# Altium PCB slots.PcbDoc
Units mil, origin at the board's own origin, x right, y up, seen from the top; angles counter-clockwise.
Board outline 2362.2 x 1574.8 mil, 2 copper layers (Top Layer, Bottom Layer); 2 components, 1 nets, 6 pads, 0 vias.
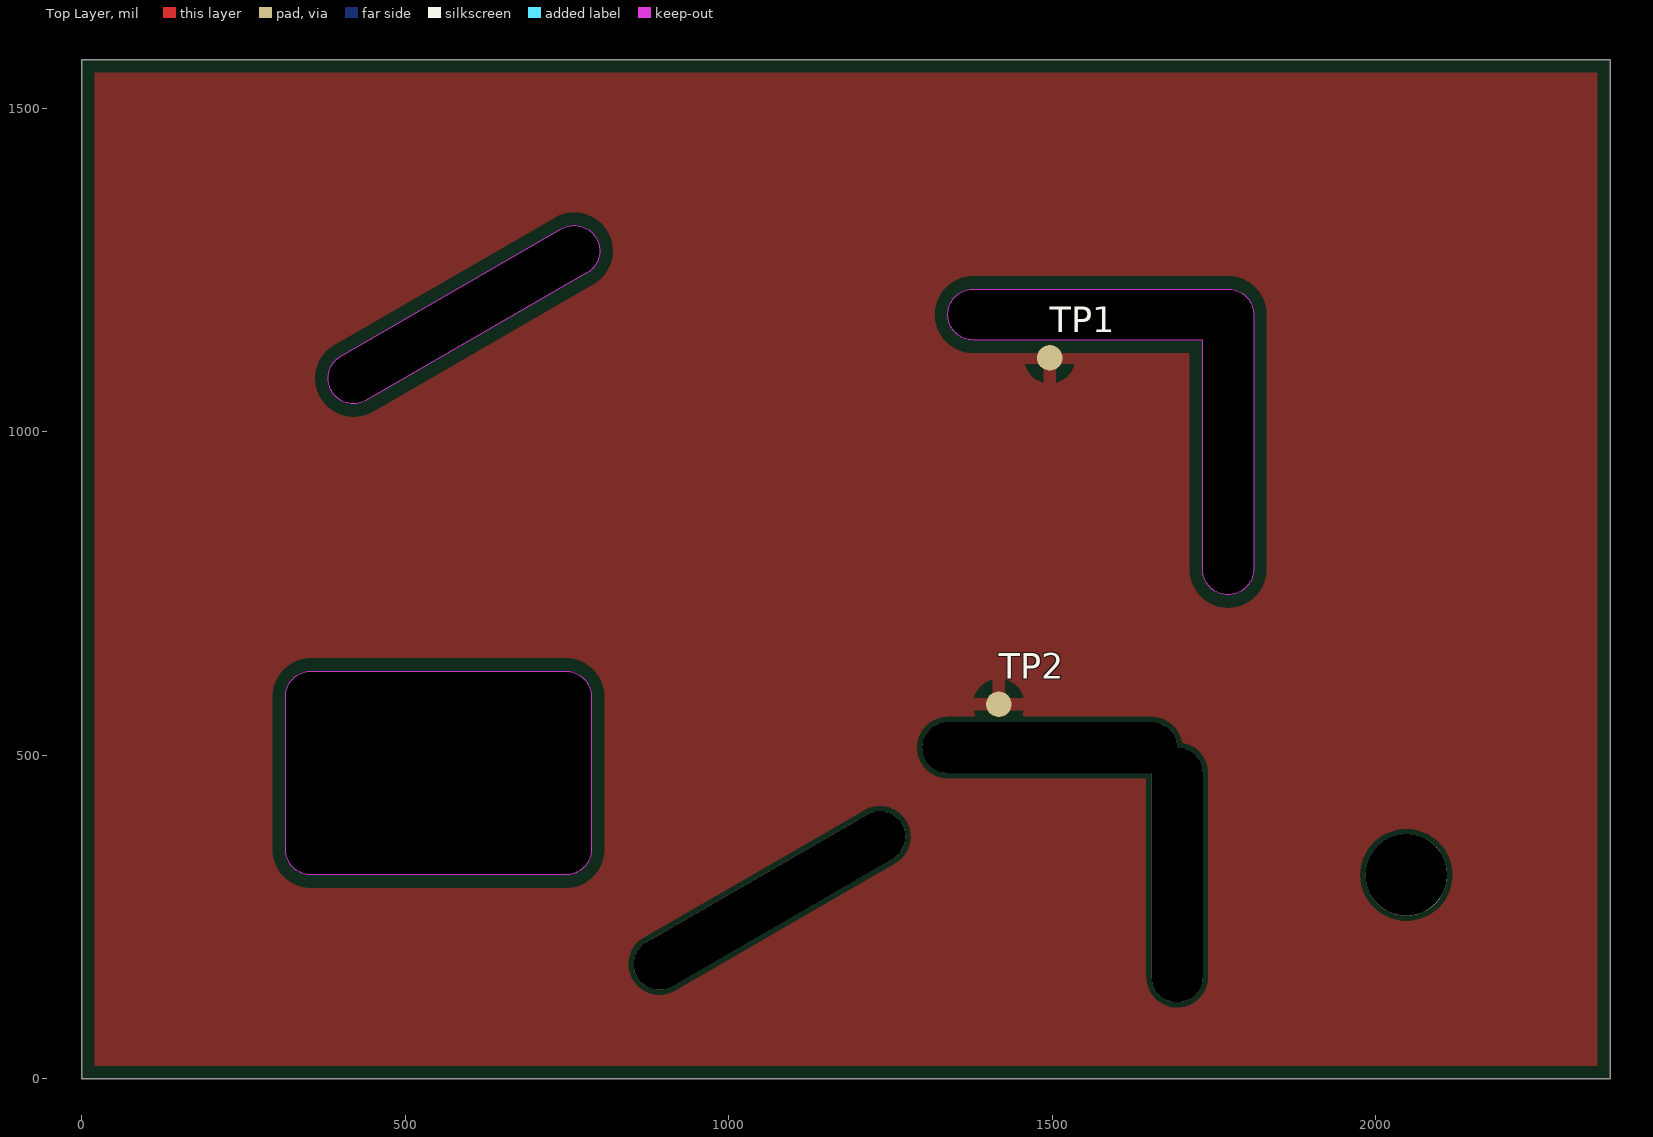
[diagram p0: Top Layer view]
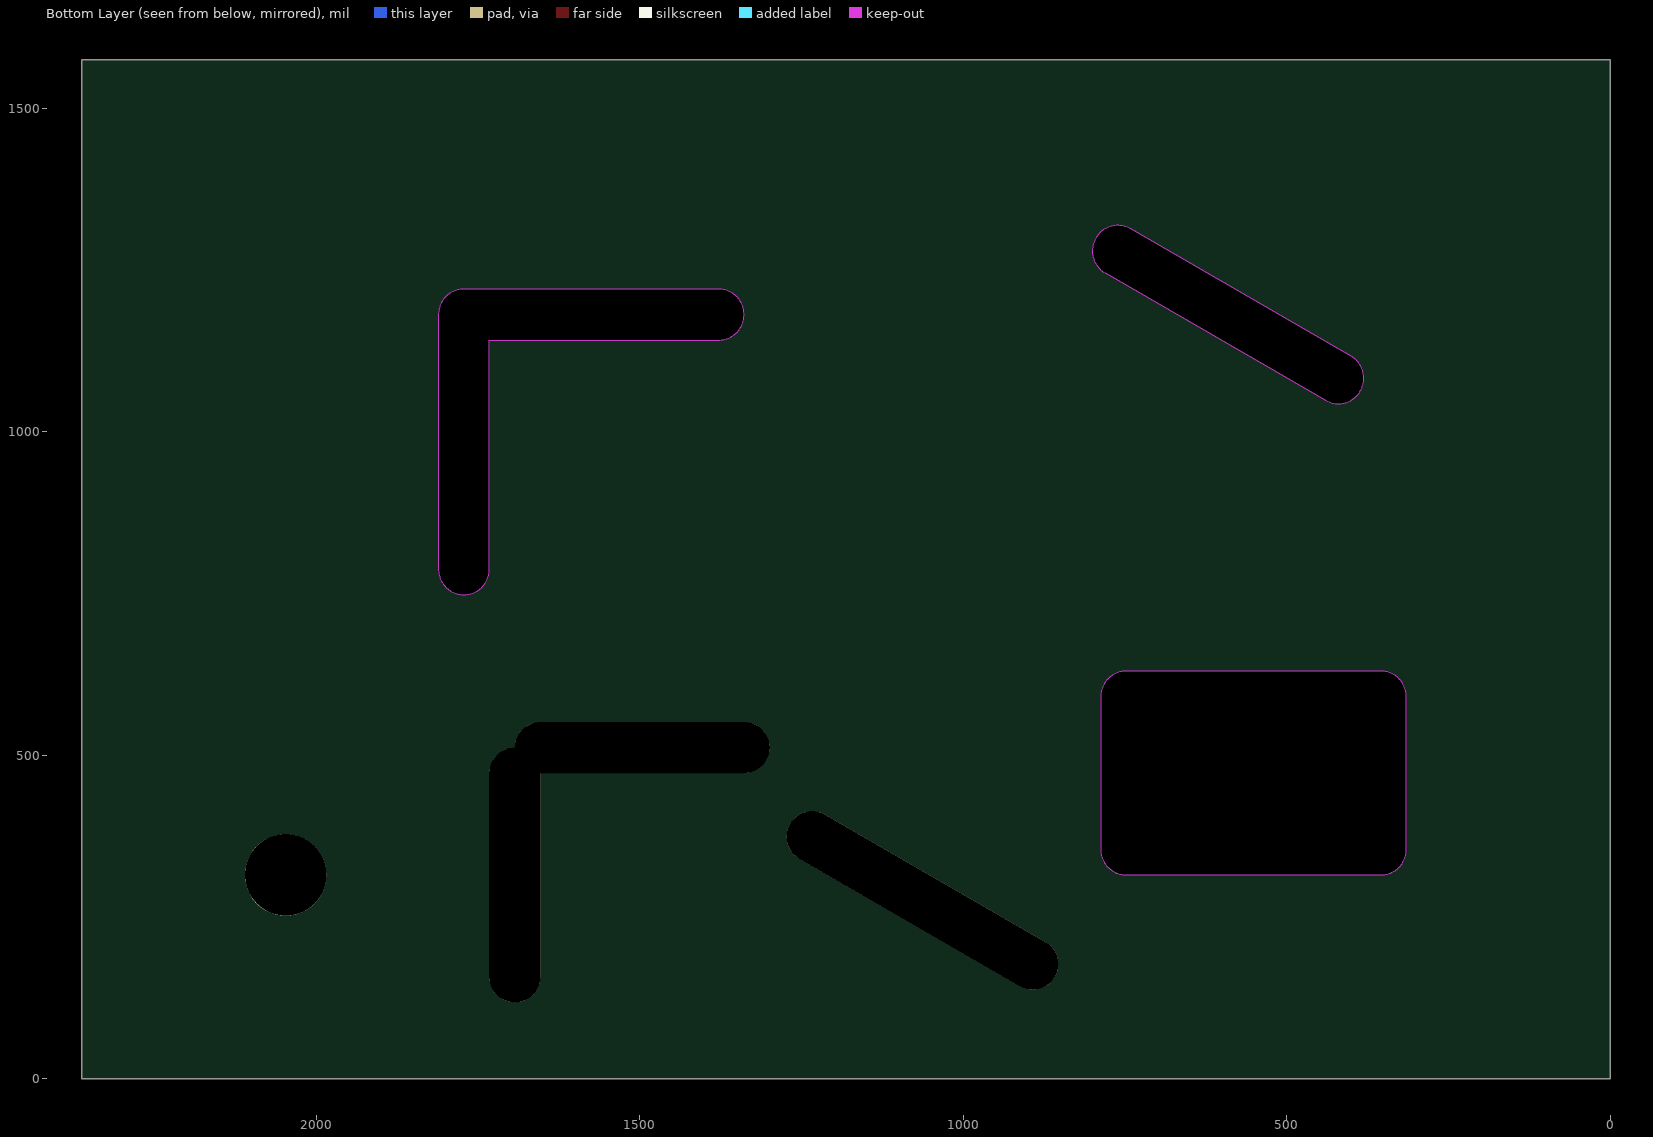
[diagram p1: Bottom Layer view, seen from below]

## Layer stack, top to bottom
Top Solder: solder mask 0.4, Solder Resist, Dk 3.5
Top Layer: signal copper 1.4
Dielectric 1: dielectric 12.6, FR-4, Dk 4.8
Bottom Layer: signal copper 1.4
Bottom Solder: solder mask 0.4, Solder Resist, Dk 3.5

## Board outline
0,1574.8 2362.2,1574.8 2362.2,0 0,0
cut-out: 354.33,629.92 748.03,629.92 749.96,629.87 751.89,629.73 753.81,629.5 755.71,629.16 757.6,628.74 759.46,628.23 761.29,627.62 763.1,626.92 764.86,626.14 766.59,625.27 768.27,624.32 769.9,623.29 771.48,622.17 773.01,620.98 774.47,619.72 775.87,618.39 777.2,616.99 778.46,615.53 779.65,614 780.77,612.42 781.8,610.79 782.75,609.11 783.62,607.38 784.4,605.62 785.1,603.81 785.71,601.98 786.22,600.12 786.65,598.23 786.98,596.33 787.21,594.41 787.35,592.48 787.4,590.55 787.4,354.33 787.35,352.4 787.21,350.47 786.98,348.55 786.65,346.65 786.22,344.76 785.71,342.9 785.1,341.07 784.4,339.26 783.62,337.5 782.75,335.77 781.8,334.09 780.77,332.46 779.65,330.88 778.46,329.35 777.2,327.89 775.87,326.49 774.47,325.16 773.01,323.9 771.48,322.71 769.9,321.6 768.27,320.56 766.59,319.61 764.86,318.74 763.1,317.96 761.29,317.26 759.46,316.66 757.6,316.14 755.71,315.72 753.81,315.39 751.89,315.15 749.96,315.01 748.03,314.96 354.33,314.96 352.4,315.01 350.47,315.15 348.55,315.39 346.65,315.72 344.76,316.14 342.9,316.66 341.07,317.26 339.26,317.96 337.5,318.74 335.77,319.61 334.09,320.56 332.46,321.6 330.88,322.71 329.35,323.9 327.89,325.16 326.49,326.49 325.16,327.89 323.9,329.35 322.71,330.88 321.6,332.46 320.56,334.09 319.61,335.77 318.74,337.5 317.96,339.26 317.26,341.07 316.66,342.9 316.14,344.76 315.72,346.65 315.39,348.55 315.15,350.47 315.01,352.4 314.96,354.33 314.96,590.55 315.01,592.48 315.15,594.41 315.39,596.33 315.72,598.23 316.14,600.12 316.66,601.98 317.26,603.81 317.96,605.62 318.74,607.38 319.61,609.11 320.56,610.79 321.6,612.42 322.71,614 323.9,615.53 325.16,616.99 326.49,618.39 327.89,619.72 329.35,620.98 330.88,622.17 332.46,623.29 334.09,624.32 335.77,625.27 337.5,626.14 339.26,626.92 341.07,627.62 342.9,628.23 344.76,628.74 346.65,629.16 348.55,629.5 350.47,629.73 352.4,629.87
cut-out: 400.39,1116.77 741.34,1313.62 743.04,1314.55 744.78,1315.39 746.56,1316.14 748.37,1316.81 750.22,1317.38 752.09,1317.87 753.98,1318.26 755.89,1318.56 757.81,1318.77 759.74,1318.88 761.67,1318.89 763.6,1318.81 765.53,1318.64 767.44,1318.37 769.34,1318.01 771.22,1317.56 773.07,1317.01 774.9,1316.37 776.69,1315.65 778.44,1314.84 780.15,1313.94 781.82,1312.96 783.43,1311.9 785,1310.76 786.5,1309.55 787.94,1308.26 789.32,1306.91 790.63,1305.49 791.87,1304 793.03,1302.46 794.12,1300.86 795.12,1299.21 796.05,1297.52 796.89,1295.78 797.64,1294 798.31,1292.18 798.89,1290.34 799.37,1288.47 799.76,1286.58 800.06,1284.67 800.27,1282.74 800.38,1280.82 800.39,1278.88 800.31,1276.95 800.14,1275.03 799.87,1273.11 799.51,1271.22 799.06,1269.34 798.51,1267.48 797.88,1265.66 797.15,1263.87 796.34,1262.11 795.44,1260.4 794.46,1258.74 793.4,1257.12 792.26,1255.56 791.05,1254.06 789.76,1252.61 788.41,1251.24 786.99,1249.93 785.5,1248.69 783.96,1247.53 782.36,1246.44 780.71,1245.43 439.76,1048.58 438.06,1047.66 436.32,1046.82 434.54,1046.06 432.73,1045.4 430.88,1044.82 429.01,1044.34 427.12,1043.94 425.21,1043.64 423.29,1043.44 421.36,1043.33 419.43,1043.31 417.5,1043.39 415.57,1043.57 413.66,1043.83 411.76,1044.19 409.88,1044.65 408.03,1045.19 406.21,1045.83 404.41,1046.56 402.66,1047.37 400.95,1048.26 399.28,1049.24 397.67,1050.3 396.11,1051.44 394.6,1052.66 393.16,1053.94 391.78,1055.3 390.47,1056.72 389.24,1058.2 388.07,1059.74 386.99,1061.34 385.98,1062.99 385.05,1064.69 384.21,1066.43 383.46,1068.21 382.79,1070.02 382.22,1071.87 381.73,1073.74 381.34,1075.63 381.04,1077.54 380.84,1079.46 380.72,1081.39 380.71,1083.32 380.79,1085.25 380.96,1087.18 381.23,1089.09 381.59,1090.99 382.05,1092.87 382.59,1094.72 383.23,1096.55 383.95,1098.34 384.76,1100.09 385.66,1101.8 386.64,1103.47 387.7,1105.08 388.84,1106.64 390.05,1108.15 391.34,1109.59 392.69,1110.97 394.12,1112.28 395.6,1113.52 397.14,1114.68 398.74,1115.77
cut-out: 1377.95,1220.47 1771.65,1220.47 1773.59,1220.43 1775.51,1220.28 1777.43,1220.05 1779.33,1219.72 1781.22,1219.29 1783.08,1218.78 1784.92,1218.17 1786.72,1217.48 1788.49,1216.69 1790.21,1215.82 1791.89,1214.87 1793.53,1213.84 1795.11,1212.72 1796.63,1211.54 1798.09,1210.27 1799.49,1208.94 1800.82,1207.54 1802.09,1206.08 1803.28,1204.56 1804.39,1202.98 1805.42,1201.34 1806.37,1199.66 1807.24,1197.94 1808.03,1196.17 1808.72,1194.37 1809.33,1192.53 1809.84,1190.67 1810.27,1188.78 1810.6,1186.88 1810.83,1184.96 1810.98,1183.03 1811.02,1181.1 1811.02,787.4 1810.98,785.47 1810.83,783.54 1810.6,781.62 1810.27,779.72 1809.84,777.84 1809.33,775.97 1808.72,774.14 1808.03,772.34 1807.24,770.57 1806.37,768.84 1805.42,767.16 1804.39,765.53 1803.28,763.95 1802.09,762.43 1800.82,760.96 1799.49,759.56 1798.09,758.23 1796.63,756.97 1795.11,755.78 1793.53,754.67 1791.89,753.63 1790.21,752.68 1788.49,751.81 1786.72,751.03 1784.92,750.33 1783.08,749.73 1781.22,749.21 1779.33,748.79 1777.43,748.46 1775.51,748.22 1773.59,748.08 1771.65,748.03 1769.72,748.08 1767.79,748.22 1765.88,748.46 1763.97,748.79 1762.09,749.21 1760.22,749.73 1758.39,750.33 1756.59,751.03 1754.82,751.81 1753.09,752.68 1751.41,753.63 1749.78,754.67 1748.2,755.78 1746.68,756.97 1745.21,758.23 1743.81,759.56 1742.48,760.96 1741.22,762.43 1740.03,763.95 1738.92,765.53 1737.88,767.16 1736.93,768.84 1736.06,770.57 1735.28,772.34 1734.58,774.14 1733.98,775.97 1733.46,777.84 1733.04,779.72 1732.71,781.62 1732.47,783.54 1732.33,785.47 1732.28,787.4 1732.28,1141.73 1377.95,1141.73 1376.02,1141.78 1374.09,1141.92 1372.18,1142.16 1370.27,1142.49 1368.39,1142.91 1366.52,1143.43 1364.69,1144.03 1362.89,1144.73 1361.12,1145.51 1359.39,1146.38 1357.71,1147.33 1356.08,1148.37 1354.5,1149.48 1352.98,1150.67 1351.51,1151.93 1350.11,1153.26 1348.78,1154.66 1347.52,1156.13 1346.33,1157.65 1345.22,1159.23 1344.18,1160.86 1343.23,1162.54 1342.36,1164.27 1341.58,1166.04 1340.88,1167.84 1340.28,1169.67 1339.76,1171.54 1339.34,1173.42 1339.01,1175.33 1338.77,1177.24 1338.63,1179.17 1338.58,1181.1 1338.63,1183.03 1338.77,1184.96 1339.01,1186.88 1339.34,1188.78 1339.76,1190.67 1340.28,1192.53 1340.88,1194.37 1341.58,1196.17 1342.36,1197.94 1343.23,1199.66 1344.18,1201.34 1345.22,1202.98 1346.33,1204.56 1347.52,1206.08 1348.78,1207.54 1350.11,1208.94 1351.51,1210.27 1352.98,1211.54 1354.5,1212.72 1356.08,1213.84 1357.71,1214.87 1359.39,1215.82 1361.12,1216.69 1362.89,1217.48 1364.69,1218.17 1366.52,1218.78 1368.39,1219.29 1370.27,1219.72 1372.18,1220.05 1374.09,1220.28 1376.02,1220.43

## Design rules (kind name [scope] priority, off if disabled: settings)
BoardOutlineClearance [All] p1: gap=19.68 ignorepadtopadclearanceinfootprint=FALSE
Clearance [All] p1: gap=7.87 ignorepadtopadclearanceinfootprint=FALSE
HoleToHoleClearance [All] p1: gap=9.84 allowstackedmicrovias=FALSE
PolygonConnect PolygonConnect_net_GND [InNet('GND')] p1: thpad.connectstyle=Relief thpad.reliefconductorwidth=19.68 thpad.reliefentries=4 thpad.polygonreliefangle="90 Angle" thpad.airgapwidth=19.68 smdpad.connectstyle=Relief smdpad.reliefconductorwidth=19.68 smdpad.reliefentries=4 smdpad.polygonreliefangle="90 Angle" smdpad.airgapwidth=19.68 via.connectstyle=Direct via.reliefconductorwidth=19.68 via.reliefentries=4 via.polygonreliefangle="90 Angle" via.airgapwidth=19.68
PolygonConnect [All] p2: thpad.connectstyle=Relief thpad.reliefconductorwidth=19.68 thpad.reliefentries=4 thpad.polygonreliefangle="90 Angle" thpad.airgapwidth=19.68 smdpad.connectstyle=Relief smdpad.reliefconductorwidth=19.68 smdpad.reliefentries=4 smdpad.polygonreliefangle="90 Angle" smdpad.airgapwidth=19.68 via.connectstyle=Direct via.reliefconductorwidth=19.68 via.reliefentries=4 via.polygonreliefangle="90 Angle" via.airgapwidth=19.68
RoutingVias [All] p1: holewidth=11.81 width=23.62 viastyle="Through Hole" minholewidth=11.81 minwidth=23.62 maxholewidth=11.81 maxwidth=23.62
Width [All] p1: maxlimit=9.84 minlimit=9.84 preferedwidth=9.84

## Components (designator, comment, footprint, x,y, rotation, side; value= is the part's Value field where it differs from the comment)
TP1 "TestPoint_Pad_D1mm" TestPoint_Pad_D1mm 1496.06,1114.17 r0 top
TP2 "TestPoint_Pad_D1mm" TestPoint_Pad_D1mm 1417.32,578.74 r0 top

## Footprints (in the part's own frame and the unit in brackets; to place one, negate y for a bottom-side part, rotate by r counter-clockwise, add the part's x,y. Pads: shape width x height; smd on the part's side, far side on the other; paste and mask are expansions set on the pad)
TestPoint_Pad_D1mm [mm]
  round 1 smd: 1(0,0)

## Part data
TP1 TP2: library part TestPoint

## Free pads (board coordinates)
  oval 472.44x78.74 hole 78.74 slot 472.44 at 30 deg unplated rot 30: ""(1062.99,275.59)
  oval 393.7x78.74 hole 78.74 slot 393.7 at 0 deg unplated: ""(1496.06,511.81)
  oval 78.74x393.7 hole 78.74 slot 393.7 at 90 deg unplated: ""(1692.91,314.96)
  round 125.98 hole 125.98 unplated: ""(2047.24,314.96)

## Nets (pads, with @x,y where several pads share a name; then routed paths per layer and width w, separated by ;. In a path a pad name is that pad's centre, name@x,y a point inside that pad or via, vN(x,y) a via of type N, cw(c..) or ccw(c..) an arc to the next point about the centre after c; other vN are vias at no path point)
GND: TP1.1 TP2.1

## Polygon pours and split planes (outlines as drawn)
GND on Top Layer "GND" (solid, remove dead copper, pour order 0): 0,1574.8 2362.2,1574.8 2362.2,0 0,0